# Altium PCB Single_ETU_b_rev1.PcbDoc (part 2 of 6)
Units mil, origin at the board's own origin, x right, y up, seen from the top; angles counter-clockwise.
Board outline 5341 x 2710 mil, 10 copper layers (Top Layer, GND1, Signal 1, GND2, VDDA, VDD, GND3, Signal 2, GND4, Bottom Layer), stack 59.76 mil thick; 283 components, 478 nets, 1863 pads, 875 vias.
Unrouted connection lines stored in the file: 3.
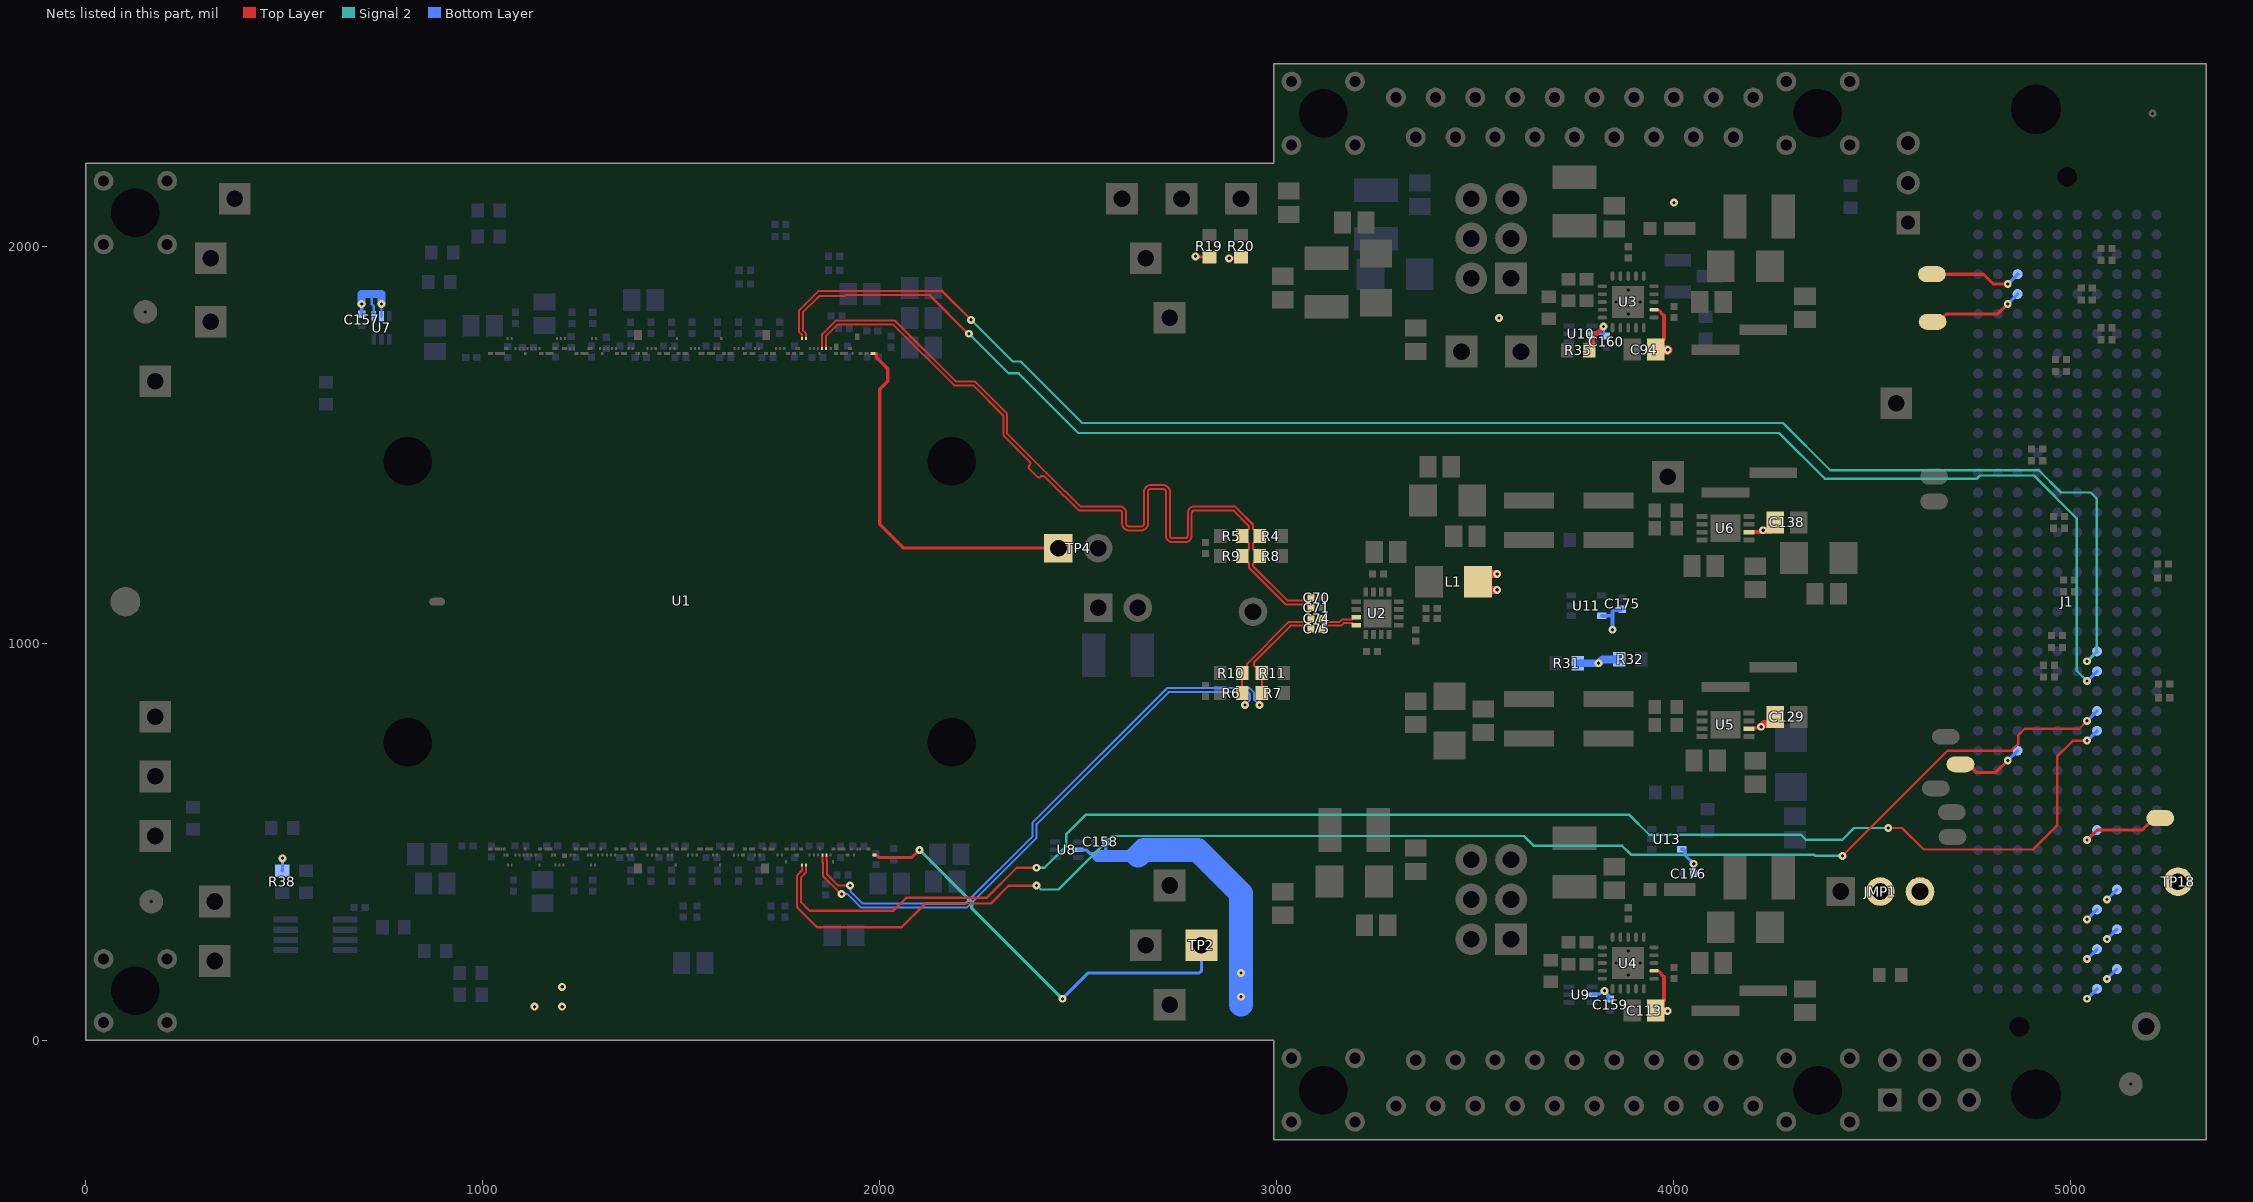
[diagram p10: the nets of this part, all layers, seen from the top]

## Part data
C1 C2 C3 C4 C5 C6 C7 C8 C9 C10 C11 C12 C13 C14 C15 C16 C17 C18 C19 C20 C21 C22 C23 C24 C25 C26 C27 C28 C29 C30 C31 C32 C33 C34 C35 C36 C37 C38 C39 C40 C41 C42 C43 C44 C45 C46 C47 C48 C49 C50 C51 C52 C53 C54 C55 C56 C57 C58 C59 C60 C61 C62 C63 C64 C65 C66 C68 C69 C70 C71 C72 C73 C74 C75 C76 C92 C96 C112 C115 C127 C135 C141 C142 C143 C144 C145 C146 C147 C148 C149 C150 C151 C152 C153 C154 C155 C156 C157 C158 C159 C160 C161 C162 C163 C164 C165 C166 C167 C168 C169 C170 C171 C172 C173 C174 C178: library part "cap 0.1uF", "CAP CER 0.1UF 10V 10% X5R 0201", Operating Temperature="-55°C ~ 85°C", Package / Case="0201 (0603 Metric)", Ratings=-, Temperature Coefficient=X5R, Tolerance=±10%, Voltage - Rated=6.3V, Applications="General Purpose", Capacitance=.1uF, Category=Capacitors, Features=-, Height - Seated (Max)=".013\" (0.33mm)", Lead Spacing=-, Lead Style=-, Mounting Type="Surface Mount, MLCC", Packaging="Cut Tape (CT)", RoHS="RoHS Compliant", Size / Dimension="0.024\" L x 0.012\" W (0.60mm x 0.30mm)", Supplier 1=Digi-Key, Thickness (Max)="0.013\" (0.33mm)"
  C153 C154 C169 C170: Assembly comment="DNP for VCU128 use"
C67 C78 C79 C83 C85 C86 C87 C97 C98 C102 C104 C105 C106 C116 C118 C119 C120 C121 C122 C126 C128 C130 C134 C136 C137 C139 C140: library part "cap 0.1uF", "CAP CER 22UF 10V 10% X5R 0805", Operating Temperature="-55°C ~ 85°C", Package / Case=0805, Ratings=-, Temperature Coefficient=X5R, Tolerance=±10%, Voltage - Rated=10V, Applications="General Purpose", Capacitance=22uF, Category=Capacitors, ComponentLink1Description=Samsung..., ComponentLink1URL=Samsung..., ComponentLink2URL=Samsung..., ComponentLink3URL=Samsung..., Features=-, Height - Seated (Max)=".055\" (1.40mm)", Lead Spacing=-, Lead Style=-, Mounting Type="Surface Mount, MLCC", Packaging="Cut Tape (CT)", RoHS="RoHS Compliant", Size / Dimension="0.079\" L x 0.024\" W (2.00mm x 1.25mm)", Supplier 1=Digi-Key, Thickness (Max)="0.055\" (1.4mm)"
C77 C81 C84 C90 C100 C103 C109 C117: library part "cap 0.1uF", "CAP CER 47UF 10V 10% X7R 1210", Manufacturer=Murata, Operating Temperature="-55°C ~ 125°C", Package / Case=1210, Ratings=-, Temperature Coefficient=X7R, Tolerance=±10%, Voltage - Rated=10V, Applications="General Purpose", Capacitance=47uF, Category=Capacitors, ComponentLink1Description=Murata, ComponentLink1URL=Murata, ComponentLink2URL=Murata, ComponentLink3URL=Murata, Features=-, Height - Seated (Max)=".106\" (2,7mm)", Lead Spacing=-, Lead Style=-, Mounting Type="Surface Mount, MLCC", Packaging="Cut Tape (CT)", RoHS="RoHS Compliant", Size / Dimension="0.126\" L x 0.098\" W (3.20mm x 2.50mm)", Supplier 1=Digi-Key, Thickness (Max)="0.106\" (2.7mm)"
C80 C82 C89 C93 C94 C99 C101 C108 C110 C113 C123 C124 C125 C129 C131 C132 C133 C138: library part "cap 0.1uF", "CAP CER 10UF 10V 10% X7R 0805", Operating Temperature="-55°C ~ 125°C", Package / Case=0805, Ratings=-, Temperature Coefficient=X7R, Tolerance=±10%, Voltage - Rated=10V, Applications="General Purpose", Capacitance=10uF, Category=Capacitors, ComponentLink1Description=Samsung..., ComponentLink1URL=Samsung..., ComponentLink2URL=Samsung..., ComponentLink3URL=Samsung..., Features=-, Height - Seated (Max)=".055\" (1.40mm)", Lead Spacing=-, Lead Style=-, Mounting Type="Surface Mount, MLCC", Packaging="Cut Tape (CT)", RoHS="RoHS Compliant", Size / Dimension="0.079\" L x 0.024\" W (2.00mm x 1.25mm)", Supplier 1=Digi-Key, Thickness (Max)="0.055\" (1.4mm)"
C88 C95 C107 C114 C175 C176: library part "cap 0.1uF", "CAP CER 0.1UF 10V 10% X5R 0201", Manufacturer="TDK Corporation", Operating Temperature="-55°C ~ 85°C", Package / Case="0201 (0603 Metric)", Ratings=-, Temperature Coefficient=X5R, Tolerance=±10%, Voltage - Rated=6.3V, Applications="General Purpose", Capacitance=.1uF, Category=Capacitors, ComponentLink1Description=http://www.tdk.com/pdf/TDKMLCCCapRange.pdf, ComponentLink1URL=http://www.tdk.com/pdf/mlcc_prod_guide/MLCC%20Product%20Guide%20A14.pdf, ComponentLink2URL=http://product.tdk.com/en/catalog/datasheets/mlcc_commercial_general_en.pdf, ComponentLink3URL=http://product.tdk.com/en/catalog/spec/mlccspec_commercial_general_midvoltage_en.pdf, Features=-, Height - Seated (Max)=".013\" (0.33mm)", Lead Spacing=-, Lead Style=-, Mounting Type="Surface Mount, MLCC", Packaging="Cut Tape (CT)", RoHS="RoHS Compliant", Size / Dimension="0.024\" L x 0.012\" W (0.60mm x 0.30mm)", Supplier 1=Digi-Key, Thickness (Max)="0.013\" (0.33mm)"
C91 C111: library part "cap 0.1uF", "CAP CER 0.01UF 10V 10% X5R 0603", Operating Temperature="-55°C ~ 85°C", Package / Case=1608[0603], Ratings=-, Temperature Coefficient=X5R, Tolerance=±10%, Voltage - Rated=10V, Applications="General Purpose", Capacitance=0.01uF, Category=Capacitors, ComponentLink1Description=http://www.tdk.com/pdf/TDKMLCCCapRange.pdf, ComponentLink2URL=http://product.tdk.com/en/catalog/datasheets/mlcc_commercial_general_en.pdf, ComponentLink3URL=http://product.tdk.com/en/catalog/spec/mlccspec_commercial_general_midvoltage_en.pdf, Features=-, Height - Seated (Max)=".037\" (0.95mm)", Lead Spacing=-, Lead Style=-, Mounting Type="Surface Mount, MLCC", Packaging="Cut Tape (CT)", RoHS="RoHS Compliant", Size / Dimension="0.063\" L x 0.031\" W (1.60mm x 0.80mm)", Supplier 1=Digi-Key, Thickness (Max)="0.037\" (0.95mm)"
C177: library part "cap 0.1uF", "CAP CER 100pF 10V 10% X5R 0603", Capacitance=0.01uF, Operating Temperature="-55°C ~ 85°C", Package / Case=1608[0603], Ratings=-, Temperature Coefficient=X5R, Tolerance=±10%, Voltage - Rated=10V, Applications="General Purpose", Category=Capacitors, ComponentLink1Description=http://www.tdk.com/pdf/TDKMLCCCapRange.pdf, ComponentLink2URL=http://product.tdk.com/en/catalog/datasheets/mlcc_commercial_general_en.pdf, ComponentLink3URL=http://product.tdk.com/en/catalog/spec/mlccspec_commercial_general_midvoltage_en.pdf, Features=-, Height - Seated (Max)=".037\" (0.95mm)", Lead Spacing=-, Lead Style=-, Mounting Type="Surface Mount, MLCC", Packaging="Cut Tape (CT)", RoHS="RoHS Compliant", Size / Dimension="0.063\" L x 0.031\" W (1.60mm x 0.80mm)", Supplier 1=Digi-Key, Thickness (Max)="0.037\" (0.95mm)"
D1 D2: library part "D Schottky", "1A @ 0.58V SMT Schottky diode, TJ -40 to +175degC, Vrrm 100V, Ir 200uA @ 70V @125degC, DO-219AD (MicroSMP)", package=DO-219ADC, ETU_manf=Vishay, ETU_PN=V1PM10-M3/H, ETU_PN_PO=V1PM10-M3/HGICT-ND, ETU_vendor=Digikey.com
J1: "MC-HPC-10, FMC High-pin count connector, lead free, 400 I/Os, male, 10 mm mated stack height", Manufacturer=Samtec, Manufacturer Ref=SEAM-40-03.5-S-10-2-A-K-TR-VITA57.0, PartName=ASP-134488-01, Supplier Part Number 1=SAM8730-ND, Gender=male, Mated Stack Height="10 mm", Number I/O=400, Part=ASP-134488-01, Pin Count=High, Pitch="1.27 mm", Solder Type=Lead-Free, Supplier 1=Digi-Key, Vita PartNumber=MC-HPC-10
J2: "Header, 3-Pin, Dual row", LatestRevisionDate=17-Jul-2002, LatestRevisionNote="Re-released for DXP Platform.", Publisher="Altium Limited"
J3 TP4: "Header, 2-Pin", LatestRevisionDate=17-Jul-2002, LatestRevisionNote="Re-released for DXP Platform.", Publisher="Altium Limited"
JMP1 JMP10: "Header, 3-Pin", LatestRevisionDate=17-Jul-2002, LatestRevisionNote="Re-released for DXP Platform.", Publisher="Altium Limited"
JMP2 JMP3 JMP6 JMP8: library part "Header 2", "Header, 2-Pin, 0.05\" pitch", LatestRevisionDate=17-Jul-2002, LatestRevisionNote="Re-released for DXP Platform.", Publisher="Altium Limited"
JMP4 JMP5: "Header, 3-Pin, Dual row, SMT", LatestRevisionDate=17-Jul-2002, LatestRevisionNote="Re-released for DXP Platform.", Publisher="Altium Limited"
JMP7 JMP9: library part "Header 2X2", "Header, 2-Pin, Dual row, SMT", LatestRevisionDate=17-Jul-2002, LatestRevisionNote="Re-released for DXP Platform.", Publisher="Altium Limited"
L1 L2 L3 L4 L5 L6 L7 L8 L9 L10: Current Rating="4 Amps", DC Resistance (DCR)="0.03 ohms (Max)", Inductance="120 ohms @ 100MHz", Manufacturer="Laird-Signal Integrity Products", Manufacturer Part Number=HI1206P121R-10, Package / Case="1206 (3216 Metric)", Supplier Part Number 1=240-2410-1-ND, Applications="power filter", Category=Inductors, ComnponentLink3Description=http://lairdtech.thomasnet.com/Asset/Part-Number-Nomenclature-FErrite-EMI.pdf, ComponentLink1Description=http://www.lairdtech.com/WorkArea/linkit.aspx?LinkIdentifier=id&ItemID=4849, ComponentLink1URL=http://lairdtech.thomasnet.com/item/differential-mode/chip-beads-power-filtering/pn-5776, ComponentLink2Description=http://www.lairdtech.com/WorkArea/linkit.aspx?LinkIdentifier=id&ItemID=1939, Height - Seated (Max)="0.051\" (1.30mm)", Mounting Type="Surface Mount", Packaging="Cut Tape (CT)", Pricing 1="1=0.1, 10=0.087, 25=0.0788, 50=0.0708, 100=0.05190, 250=0.03776, 500=0.0346, 1000=0.02989", RoHS="RoHS Compliant", Size / Dimension="0.126\" L x 0.062\" W (3.20mm x 1.60mm)", Supplier 1=Digi-Key, Thickness (Max)="0.051\" (1.30mm)"
R1 R2 R21 R22: library part R, "1k ohm 1/10W 50V 1% +/- 100 PPM thick film resistor. 0603.", package=RM0603, ETU_manf="Vishay Dale", ETU_manf_ds=http://www.vishay.com/docs/20035/dcrcwe3.pdf, ETU_manf_url=http://www.vishay.com/resistors-fixed/list/product-20035/, ETU_PN=CRCW06031K00FKEA, ETU_PN_PO=541-1.00KHCT-ND, ETU_vendor=Digikey, item=23b, manf="State of the Art", manf_ds=http://www.resistor.com/assets/pdf/12mil.pdf, manf_url=http://www.resistor.com/pthick_mil.htm, Min PO QTY=36, PN=M55342K12B1E00R, PN_PO=M55342K12B1E00R, Vendor="State of the Art"
  R1 R2: Assembly comment="DNP for bottom side control"
  R21 R22: Assembly comment="DNP for top side control"
R3 R12 R13 R14 R19 R20 R30 R31 R32 R33 R34 R36 R37: library part R, "4.7k ohm 1/10W 50V 1% +/- 25 PPM thin film resistor. 0603.", package=RM0603, manf="State of the Art", Vendor="State of the Art"
  R19 R36: ETU_manf_ds=http://www.vishay.com/docs/20035/dcrcwe3.pdf, ETU_manf_url=http://www.vishay.com/resistors-fixed/list/product-20035/, manf_ds=http://www.resistor.com/assets/pdf/12milthn.pdf, manf_url=http://www.resistor.com/pthin_mil.htm, PN_PO=55342E12B10E0R
  R20 R37: ETU_manf_ds=http://www.vishay.com/docs/20035/dcrcwe3.pdf, ETU_manf_url=http://www.vishay.com/resistors-fixed/list/product-20035/, manf_ds=http://www.resistor.com/assets/pdf/12milthn.pdf, manf_url=http://www.resistor.com/pthin_mil.htm
R4 R5 R6 R7 R35: library part R, "10k ohm 1/10W 50V 1% +/- 25 PPM thin film resistor. 0603.", package=RM0603, manf="State of the Art", Vendor="State of the Art"
  R4 R5 R6 R7: ETU_manf_ds=http://www.vishay.com/docs/20035/dcrcwe3.pdf, ETU_manf_url=http://www.vishay.com/resistors-fixed/list/product-20035/, ETU_PN_PO=541-10.0-KHCT-ND, manf_ds=http://www.resistor.com/assets/pdf/12milthn.pdf, manf_url=http://www.resistor.com/pthin_mil.htm, PN=M55342E12B10E0R, PN_PO=M55342E12B10E0R
R8 R9 R10 R11: library part R, "2k ohm 1/10W 50V 1% +/- 25 PPM thin film resistor. 0603.", package=RM0603, manf="State of the Art", manf_ds=http://www.resistor.com/assets/pdf/12milthn.pdf, manf_url=http://www.resistor.com/pthin_mil.htm, Vendor="State of the Art"
R15 R16 R17 R18: library part R, "0k ohm 0603.", package=RM0603, ETU_manf="Vishay Dale", ETU_vendor=Digikey, manf="State of the Art", Vendor="State of the Art"
  R15 R16: Assembly comment="DNP for bottom side control"
  R17 R18: Assembly comment="DNP for top side control"
R23 R25: library part R, "12.4k ohm 1/10W 50V 1% +/- 25 PPM thin film resistor. 0603.", package=RM0603, manf="State of the Art", Vendor="State of the Art"
R24 R26: library part R, "24.9k ohm 1/10W 50V 1% +/- 25 PPM thin film resistor. 0603.", package=RM0603, manf="State of the Art", Vendor="State of the Art"
R27 R28: library part R, "8.2k ohm 1/10W 50V 1% +/- 25 PPM thin film resistor. 0603.", package=RM0603, manf="State of the Art", Vendor="State of the Art"
R29: library part R, "0 ohm jumper. 1/2W. 20Amp. 0603.", package=RM0603, Assembly comment="Do not populate", manf="State of the Art", Vendor="State of the Art"
R38: library part R, "200k ohm 0603.", package=RM0603, Assembly comment="DNP for bottom side control", ETU_manf="Vishay Dale", ETU_vendor=Digikey, manf="State of the Art", Vendor="State of the Art"
R39: library part R, "160k ohm 0603.", package=RM0603, Assembly comment="DNP for bottom side control", ETU_manf="Vishay Dale", ETU_vendor=Digikey, manf="State of the Art", Vendor="State of the Art"
TP1: library part TP, "test point, wire bonding site"
TP2 TP3 TP5 TP6 TP7 TP8 TP9 TP10 TP12 TP13 TP15 TP16 TP18 TP19 TP20 TP21 TP22 TP23 TP26 TP27 TP28 TP29 TP30 TP31: "test point, wire bonding site"
U1: "Wire bonding scenario - Top and Bottom peripheries of of the chip - Updated the 27th June 2020"
U2: library part NB6L11SMNG, "No Description Available", Copyright="Copyright (C) 2016 Accelerated Designs. All rights reserved", Manufacturer_Part_Number=NB6L11SMNG, RefDes=RefDes, SourceLibrary=ONSemi_2017-12-12_4, Type=DEV, Vendor="ON Semiconductor"
U3 U4: "No Description Available", Manufacturer="Texas Instruments", Copyright="Copyright (C) 2018 Accelerated Designs. All rights reserved", PartNumber=TPS7A8500RGRR, RefDes=RefDes, Type=DEV
U5 U6: library part ST1L08PUR, "No Description Available", Built_By=EMA_Cory, Copyright="Copyright (C) 2018 Accelerated Designs. All rights reserved", Datasheet=https://www.st.com/content/ccc/resource/technical/document/datasheet/5f/25/d1/3f/f8/25/44/07/DM00123507.pdf/files/DM00123507.pdf/jcr:content/translations/en.DM00123507.pdf, Manufacturer_Part_Number=ST1L08PUR, RefDes=RefDes, SourceLibrary=Add_to_database_2020-12-03, Type=DEV, Vendor=STMicroelectronics
U7 U8 U9 U10: "Low Power Digital Temperature Sensor with SMBus/Two-Wire Serial Interface in SOT563", Manufacturer="Texas Instruments", PACKAGE_DESIGNATOR=DRL, Copyright="Copyright (C) 2018 Accelerated Designs. All rights reserved", Datasheet_URL=http://www.ti.com/lit/gpn/TMP102, FAMILY_NAME="TEMPERATURE SENSOR", GENERIC_PART_NUMBER=TMP102, INDUSTRY_STD_PKG_TYPE=SOT, Manufacturer_Part_Number=TMP102AIDRLR, PIN_COUNT=6, RefDes=RefDes, Type=DEV, Vendor="Texas Instruments"
U11 U12 U13: "No Description Available", Built_By=EMA_Jessica, Copyright="Copyright (C) 2018 Accelerated Designs. All rights reserved", RefDes=RefDes, SourceLibrary=ON_Semiconductor_2019-12-30, Type=DEV, Vendor="ON Semiconductor"
  U11 U13: Manufacturer_Part_Number=NC7SZ08P5X
  U12: Manufacturer_Part_Number=BSS123
U14: "Dual Bi-Directional I2C-Bus and SMBus Voltage Level-Translator", Manufacturer="Texas Instruments", PACKAGE_DESIGNATOR=DCT, Copyright="Copyright (C) 2018 Accelerated Designs. All rights reserved", Datasheet_URL=http://www.ti.com/lit/gpn/PCA9306, FAMILY_NAME="I2C SPECIAL FUNCTION", GENERIC_PART_NUMBER=PCA9306, INDUSTRY_STD_PKG_TYPE=SM8, Manufacturer_Part_Number=PCA9306DCTRE4, PIN_COUNT=8, RefDes=RefDes, Type=DEV, Vendor="Texas Instruments"

## Free pads (board coordinates)
  round 2 / inner round 200 / far side round 2 hole 122 unplated: 0(811,751) 0(811,1459) 0(2181,751) 0(2181,1459)
  round 50 hole 28: 1(45,45) 1(45,205) 1(45,2005) 1(45,2165) 1(205,45) 1(205,205) 1(205,2005) 1(205,2165) 1(3037,-205) 1(3037,-45) 1(3037,2255) 1(3037,2415) 1(3197,-205) 1(3197,-45) 1(3197,2255) 1(3197,2415) 1(3300,-165) 1(3300,2375) 1(3350,-50) 1(3350,2275) 1(3400,-165) 1(3400,2375) 1(3449.84,-49.68) 1(3450,2275) 1(3499.84,-164.68) 1(3499.84,2375.32) 1(3549.84,-49.68) 1(3549.84,2275.32) 1(3599.84,-164.68) 1(3599.84,2375.32) 1(3649.84,-49.68) 1(3649.84,2275.32) 1(3699.84,-164.68) 1(3699.84,2375.32) 1(3749.84,2275.32) 1(3750,-50) 1(3800,-165) 1(3800,2375) 1(3849.84,-49.68) 1(3850,2275) 1(3899.84,-164.68) 1(3899.84,2375.32) 1(3949.84,-49.68) 1(3949.84,2275.32) 1(3999.84,-164.68) 1(3999.84,2375.32) 1(4049.84,2275.32) 1(4050,-50) 1(4100,-165) 1(4100,2375) 1(4150,-50) 1(4150,2275) 1(4200,-165) 1(4200,2375) 1(4283,-205) 1(4283,-45) 1(4283,2255) 1(4283,2415) 1(4443,-205) 1(4443,-45) 1(4443,2255) 1(4443,2415)
  round 2 hole 122 unplated: 1(125,125) 1(125,2085) 1(3117,-125) 1(3117,2335) 1(4363,-125) 1(4363,2335)
  round 2 hole 125 unplated: 2(4912.26,-135.15) 2(4912.26,2345.15)
  rect 30x16 on Mech8 paste-13: 3(1010,484)
  rect 23x20 on Mech8 paste-13: 3(1052.85,461) 3(1265,461)
  rect 24x20 on Mech8 paste-13: 3(1173,461)
  rect 20x26 smd paste-10: 3(1391,433) 3(1391,1777) 3(1711,433) 3(1714,1777)
  round 72 hole 42: 4(2940,1080)
  rect 5x10 on Mech8: 6(1062.5,1769) 7(1073,1769)
  rect 5x8 on Mech8: 6(1063,442) 7(1073,442) 14(1143,442) 35(1580,467) 36(1590.5,467) 37(1643.5,467) 38(1633,467) 39(1686,467) 39(1696.5,467) 41(1742.5,467) 42(1754,467) 48(1876,467) 52(1882,450) 53(1704,442) 53(1707,482) 53(1712,482) 53(1788,467) 53(1794,467) 58(1384,442) 59(1597.5,442)
  rect 5x16 on Mech8: 8(1083,463) 8(1083,1747) 9(1093,463) 9(1093,1747) 10(1103,463) 10(1103,1747) 11(1113,463) 11(1113,1747) 12(1133,463) 12(1133,1747) 13(1123,463) 13(1123,1747) 14(1143,1747) 15(1183,438) 15(1187,1772) 16(1193,438) 16(1197,1772) 17(1203,438) 17(1207,1772) 18(1220,1747) 18(1220.5,463) 19(1230,1747) 19(1231,463) 20(1273,438) 20(1275,1772) 21(1283,438) 21(1285,1772) 22(1290,463) 22(1295,1747) 23(1335,1747) 24(1325,1747) 25(1312.5,463) 25(1315,1747) 26(1302,463) 26(1305,1747) 27(1365,463) 28(1375.5,463) 29(1414.5,1747) 29(1415.5,463) 30(1425,1747) 30(1426,463) 31(1477,463) 32(1466.5,463) 33(1517.5,463) 33(1524,1747) 34(1528,463) 34(1534.5,1747) 37(1644.5,1747) 38(1634,1747) 39(1696,1747) 40(1685.5,1747) 41(1738,1747) 42(1748.5,1747) 43(1814,438) 44(1804,438) 45(1844,1747) 45(1844.5,463) 46(1834,463) 46(1834,1747) 47(1823.5,463) 47(1824,1747) 48(1865,1747) 48(1866,463) 49(1854.5,1747) 49(1855.5,463) 53(1763.5,450) 57(1437,463)
  rect 6x8 on Mech8: 10(1107,482) 11(1107,1730) 26(1297,482) 50(1935,467) 55(1654,467) 58(1301,1730) 58(1384,1768) 60(1486,442)
  rect 12x8 on Mech8: 17(1206,1743) 51(1983,1730)
  rect 12x12 on Mech8: 18(1206,465)
  rect 5x9 on Mech8: 23(1333.5,466.5)
  rect 5x12 on Mech8: 24(1323,465) 27(1366.5,1745) 28(1377,1745) 31(1482.5,1745) 32(1472,1745)
  rect 5x14 on Mech8: 35(1583.5,1746) 36(1594,1746) 43(1814,1771) 44(1804,1771)
  rect 12x16 on Mech8: 50(1943,1772) 52(1890.5,1747)
  rect 10x8 on Mech8: 51(1987,467)
  rect 6x16 on Mech8: 52(1876,1747) 56(1539,463)
  round 10 on Mech8: 61(885,1105)
  oval 40x20 on Mech8 mask+15: 62(885,1105)
  oval 70x40 smd: 64(4650,1930) 64(4651.73,1810) 64(4655.49,1357.59) 64(4655.49,1420) 64(4660,635) 64(4685,765) 64(4700,575) 64(4702,512.59) 64(4722,695.45) 64(5225,560)
  round 60 hole 8 mask+60: Fiducial1(165,350) Fiducial2(150,1835)
  round 60 / inner round 60 / far side round 20 hole 8 mask+60: Fiducial3(5151,-110)
  round 20 / inner round 60 / far side round 60 hole 8 mask+5: Fiducial4(5206,2335)
  rect 2.76x3.94 on Mech2: L1(1021.8,518.07) L2(1028.29,518.07) L3(1034.79,518.07) L4(1041.28,518.07) L5(1047.78,518.07) L6(1054.28,518.07) L7(1060.77,518.07) L8(1067.27,518.07) L9(1073.76,518.07) L10(1080.26,518.07) L11(1086.76,518.07) L12(1093.25,518.07) L13(1099.75,518.07) L14(1106.24,518.07) L15(1112.74,518.07) L16(1119.24,518.07) L17(1125.73,518.07) L18(1132.23,518.07) L19(1138.72,518.07) L20(1145.22,518.07) L21(1151.72,518.07) L22(1158.21,518.07) L23(1164.71,518.07) L24(1171.2,518.07) L25(1177.7,518.07) L26(1184.2,518.07) L27(1190.69,518.07) L28(1197.19,518.07) L29(1203.69,518.07) L30(1210.18,518.07) L31(1216.68,518.07) L32(1223.17,518.07) L33(1229.67,518.07) L34(1236.17,518.07) L35(1242.66,518.07) L36(1249.16,518.07) L37(1255.65,518.07) L38(1262.15,518.07) L39(1268.65,518.07) L40(1275.14,518.07) L41(1281.64,518.07) L42(1288.13,518.07) L43(1294.63,518.07) L44(1301.13,518.07) L45(1307.62,518.07) L46(1314.12,518.07) L47(1320.61,518.07) L48(1327.11,518.07) L49(1333.61,518.07) L50(1340.1,518.07) L51(1346.6,518.07) L52(1353.09,518.07) L53(1359.59,518.07) L54(1366.09,518.07) L55(1372.58,518.07) L56(1379.08,518.07) L57(1385.57,518.07) L58(1392.07,518.07) L59(1398.57,518.07) L60(1405.06,518.07) L61(1411.56,518.07) L62(1418.06,518.07) L63(1424.55,518.07) L64(1431.05,518.07) L65(1437.54,518.07) L66(1444.04,518.07) L67(1450.54,518.07) L68(1457.03,518.07) L69(1463.53,518.07) L70(1470.02,518.07) L71(1476.52,518.07) L72(1483.02,518.07) L73(1489.51,518.07) L74(1496.01,518.07) L75(1502.5,518.07) L76(1509,518.07) L77(1515.5,518.07) L78(1521.99,518.07) L79(1528.49,518.07) L80(1534.98,518.07) L81(1541.48,518.07) L82(1547.98,518.07) L83(1554.47,518.07) L84(1560.97,518.07) L85(1567.46,518.07) L86(1573.96,518.07) L87(1580.46,518.07) L88(1586.95,518.07) L89(1593.45,518.07) L90(1599.94,518.07) L91(1606.44,518.07) L92(1612.94,518.07) L93(1619.43,518.07) L94(1625.93,518.07) L95(1632.43,518.07) L96(1638.92,518.07) L97(1645.42,518.07) L98(1651.91,518.07) L99(1658.41,518.07) L100(1664.91,518.07) L101(1671.4,518.07) L102(1677.9,518.07) L103(1684.39,518.07) L104(1690.89,518.07) L105(1697.39,518.07) L106(1703.88,518.07) L107(1710.38,518.07) L108(1716.87,518.07) L109(1723.37,518.07) L110(1729.87,518.07) L111(1736.36,518.07) L112(1742.86,518.07) L113(1749.35,518.07) L114(1755.85,518.07) L115(1762.35,518.07) L116(1768.84,518.07) L117(1775.34,518.07) L118(1781.83,518.07) L119(1788.33,518.07) L120(1794.83,518.07) L121(1801.32,518.07) L122(1807.82,518.07) L123(1814.32,518.07) L124(1820.81,518.07) L125(1827.31,518.07) L126(1833.8,518.07) L127(1840.3,518.07) L128(1846.8,518.07) L129(1853.29,518.07) L130(1859.79,518.07) L131(1866.28,518.07) L132(1872.78,518.07) L133(1879.28,518.07) L134(1885.77,518.07) L135(1892.27,518.07) L136(1898.76,518.07) L137(1905.26,518.07) L138(1911.76,518.07) L139(1918.25,518.07) L140(1924.75,518.07) L141(1931.24,518.07) L142(1937.74,518.07) L143(1944.24,518.07) L144(1950.73,518.07) L145(1957.23,518.07) L146(1963.72,518.07) L147(1970.2,518.07) L147(1970.99,1967) L148(1021.79,1691.93) L149(1028.28,1691.93) L150(1034.78,1691.93) L151(1041.27,1691.93) L152(1047.77,1691.93) L153(1054.27,1691.93) L154(1060.76,1691.93) L155(1067.26,1691.93) L156(1073.75,1691.93) L157(1080.25,1691.93) L158(1086.75,1691.93) L159(1093.24,1691.93) L160(1099.74,1691.93) L161(1106.23,1691.93) L162(1112.73,1691.93) L163(1119.23,1691.93) L164(1125.72,1691.93) L165(1132.22,1691.93) L166(1138.72,1691.93) L167(1145.21,1691.93) L168(1151.71,1691.93) L169(1158.2,1691.93) L170(1164.7,1691.93) L171(1171.2,1691.93) L172(1177.69,1691.93) L173(1184.19,1691.93) L174(1190.68,1691.93) L175(1197.18,1691.93) L176(1203.68,1691.93) L177(1210.17,1691.93) L178(1216.67,1691.93) L179(1223.16,1691.93) L180(1229.66,1691.93) L181(1236.16,1691.93) L182(1242.65,1691.93) L183(1249.15,1691.93) L184(1255.64,1691.93) L185(1262.14,1691.93) L186(1268.64,1691.93) L187(1275.13,1691.93) L188(1281.63,1691.93) L189(1288.12,1691.93) L190(1294.62,1691.93) L191(1301.12,1691.93) L192(1307.61,1691.93) L193(1314.11,1691.93) L194(1320.61,1691.93) L195(1327.1,1691.93) L196(1333.6,1691.93) L197(1340.09,1691.93) L198(1346.59,1691.93) L199(1353.09,1691.93) L200(1359.58,1691.93) L201(1366.08,1691.93) L202(1372.57,1691.93) L203(1379.07,1691.93) L204(1385.57,1691.93) L205(1392.06,1691.93) L206(1398.56,1691.93) L207(1405.05,1691.93) L208(1411.55,1691.93) L209(1418.05,1691.93) L210(1424.54,1691.93) L211(1431.04,1691.93) L212(1437.53,1691.93) L213(1444.03,1691.93) L214(1450.53,1691.93) L215(1457.02,1691.93) L216(1463.52,1691.93) L217(1470.01,1691.93) L218(1476.51,1691.93) L219(1483.01,1691.93) L220(1489.5,1691.93) L221(1496,1691.93) L222(1502.49,1691.93) L223(1508.99,1691.93) L224(1515.49,1691.93) L225(1521.98,1691.93) L226(1528.48,1691.93) L227(1534.98,1691.93) L228(1541.47,1691.93) L229(1547.97,1691.93) L230(1554.46,1691.93) L231(1560.96,1691.93) L232(1567.46,1691.93) L233(1573.95,1691.93) L234(1580.45,1691.93) L235(1586.94,1691.93) L236(1593.44,1691.93) L237(1599.94,1691.93) L238(1606.43,1691.93) L239(1612.93,1691.93) L240(1619.42,1691.93) L241(1625.92,1691.93) L242(1632.42,1691.93) L243(1638.91,1691.93) L244(1645.41,1691.93) L245(1651.9,1691.93) L246(1658.4,1691.93) L247(1664.9,1691.93) L248(1671.39,1691.93) L249(1677.89,1691.93) L250(1684.38,1691.93) L251(1690.88,1691.93) L252(1697.38,1691.93) L253(1703.87,1691.93) L254(1710.37,1691.93) L255(1716.86,1691.93) L256(1723.36,1691.93) L257(1729.86,1691.93) L258(1736.35,1691.93) L259(1742.85,1691.93) L260(1749.35,1691.93) L261(1755.84,1691.93) L262(1762.34,1691.93) L263(1768.83,1691.93) L264(1775.33,1691.93) L265(1781.83,1691.93) L266(1788.32,1691.93) L267(1794.82,1691.93) L268(1801.31,1691.93) L269(1807.81,1691.93) L270(1814.31,1691.93) L271(1820.8,1691.93) L272(1827.3,1691.93) L273(1833.79,1691.93) L274(1840.29,1691.93) L275(1846.79,1691.93) L276(1853.28,1691.93) L277(1859.78,1691.93) L278(1866.27,1691.93) L279(1872.77,1691.93) L280(1879.27,1691.93) L281(1885.76,1691.93) L282(1892.26,1691.93) L283(1898.75,1691.93) L284(1905.25,1691.93) L285(1911.75,1691.93) L286(1918.24,1691.93) L287(1924.74,1691.93) L288(1931.23,1691.93) L289(1937.73,1691.93) L290(1944.23,1691.93) L291(1950.72,1691.93) L292(1957.22,1691.93) L293(1963.72,1691.93) L294(1970.21,1691.93)

## Via types
v1: diameter 20, hole 8, Top Layer to Bottom Layer, tented bottom, 402 vias
v2: diameter 20, hole 8, Top Layer to Bottom Layer, 199 vias
v3: diameter 30, hole 16, Top Layer to Bottom Layer, 160 vias
v4: diameter 20, hole 8, Top Layer to Bottom Layer, tented top, 89 vias
v5: diameter 18, hole 8, Top Layer to Bottom Layer, 6 vias
v6: diameter 18/25/25/25/25/18 (per signal layer), hole 8, Top Layer to Bottom Layer, tented bottom, 4 vias
v7: diameter 18/20/20/20/20/18 (per signal layer), hole 8, Top Layer to Bottom Layer, tented bottom, 4 vias
v8: diameter 80, hole 42, Top Layer to Bottom Layer, 2 vias
v9: diameter 18/25/25/25/25/18 (per signal layer), hole 8, Top Layer to Bottom Layer, 2 vias
v10: diameter 20/20/20/20/20/18 (per signal layer), hole 8, Top Layer to Bottom Layer, tented bottom, 2 vias
v11: diameter 40/20/20/20/20/40 (per signal layer), hole 8, Top Layer to Bottom Layer, 2 vias
v12: diameter 20/20/20/20/20/18 (per signal layer), hole 8, Top Layer to Bottom Layer, 1 vias
v13: diameter 40/20/20/20/20/40 (per signal layer), hole 8, Top Layer to Bottom Layer, tented top, 1 vias
v14: diameter 20, hole 8, Top Layer to Bottom Layer, tented both sides, 1 vias

## Nets (pads, with @x,y where several pads share a name; then routed paths per layer and width w, separated by ;. In a path a pad name is that pad's centre, name@x,y a point inside that pad or via, vN(x,y) a via of type N, cw(c..) or ccw(c..) an arc to the next point about the centre after c; other vN are vias at no path point)
3P3V: C94.1 C113.1 C129.1 C138.1 C157.1 C158.1 C159.1 C160.1 C175.1 C176.1 JMP1.2 L1.1 R19.1 R20.1 R31.2 R32.1 R35.2 R38.1 U3.12 U4.12 U5.2 U6.2 U7.4 U7.5 U8.5 U9.5 U10.5 U11.5 U13.5 | length 2044.5
  Top Layer w8: v4@2793.52,1973.52 v4(2795,1975) ; v4@2796.07,1973.52 R19.1@2828.52,1973.52 ; v4(2880,1970) 2907.56,1970 R20.1@2910,1972.44 ; U4.12@3949.96,175.32 3950.24,175.04 3960.28,175.04 3975,160.31 ; U3.12@3949.96,1840.32 3950.24,1840.04 3960.28,1840.04 3975,1825.31 ; U5.2@4189,785.16 4191,787.16 4213.91,787.16 4216.75,790 v4(4220,790)
  Top Layer w10: C113.1@3960,85 3975,100 3975,160.31 ; C94.1@3960,1750 3975,1765 3975,1825.31 ; U6.2@4189,1280.16 v4@4217.45,1280.16
  Top Layer w12: R35.2@3787.07,1737.96 3796,1746.89 3796,1771 v4(3823,1798)
  Top Layer w20: L1.1@3531.68,1135 v4(3555,1135) ; L1.1@3531.68,1175 v4(3555,1175) ; C113.1@3954.53,75 3955.06,74.47 v4(3984.48,74.47) ; C94.1@3954.53,1740 C94.1@3955.06,1739.47 ; v4(4220,790) 4227.44,797.44 4243.82,797.44 4255.47,809.09 C129.1@4255.47,810 ; v4(4225,1285) 4243.82,1285 4255.47,1296.65 C138.1@4255.47,1300
  Top Layer w25: C94.1@3955.06,1739.47 v4(3984.48,1739.47)
  Bottom Layer w6: 720,1876.64 720,1855 725.31,1849.69 U7.4@725.31,1824 ; U7.5@745,1824 v1(745,1855) ; U10.5@3794,1780 3824,1780 v4@3824,1797
  Bottom Layer w8: R38.1@495,427.56 495.76,428.32 v1(495.76,458.64) ; C157.1@695,1829 v1(695,1855) ; 716.64,1880 720,1876.64 ; U8.5@2500,480.31 2500.39,479.92 2520.08,479.92 2530,470 2544.38,470 2549.06,465.31 2549.06,465 ; C158.1@2569,500 2569,466 2570,465 ; U9.5@3794,115 3796,117 3813.75,117 3821.75,125 v1(3825,125) 3825,124.31 3835,114.31 3835,109 C159.1@3840,104 ; U11.5@3818,1069.5 3842.83,1069.5 3845.33,1067 ; v4(3823,1798) v4@3824,1797 ; 3845.33,1079.67 3849,1083.34 3867.34,1083.34 C175.1@3870,1086 ; U13.5@4019.84,481.7 4023.84,481.7 4027.84,477.7 4027.84,467.16 v1(4050,445) C176.1@4050,420
  Bottom Layer w10: v4(3845.33,1034.46) 3845.33,1067 3845.33,1079.67
  Bottom Layer w20: v1(695,1855) 695,1880 716.64,1880 ; 719.64,1880 742,1880 ; v1@745,1858 745,1877 ; R31.2@3757.56,950 v2(3810,950) 3820,960 R32.1@3862.44,960 ; 742,1880 745,1880 745,1877 ; 742,1880 745,1877
  Bottom Layer w30: 2549.06,465 2570,465 2650,465
  Bottom Layer w60: 2650,465 2665,480 2800,480 2910,370 v2(2910,170) v2(2910,110) 2910,90
  other v2: 1130,85 1200,85 1200,135 3560,1820 4000,2110
12P0V: J1.C35 J1.C37 TP18.1 | length 70.7
  Bottom Layer w8: v1(5091,255) J1.C37@5116,280 ; v1(5091,355) J1.C35@5116,380
B_N: C75.1 U2.4 | length 93.7
  Top Layer w5: C75.1@3114,1037 3120.5,1043.5 3122.43,1043.5 3123.43,1044.5 3162.11,1044.5 3168.39,1050.79 3189.65,1050.79 3194.49,1045.95 U2.4@3200,1045.95
B_P: C74.1 U2.3 | length 93.7
  Top Layer w5: C74.1@3114,1062 3120.5,1055.5 3122.43,1055.5 3123.43,1054.5 3157.96,1054.5 3164.25,1060.79 3189.65,1060.79 3194.49,1065.63 U2.3@3200,1065.63
CLK_DELAY_CLK: J1.H28 pad.64@4722,695.45 | length 175.3
  Top Layer w8: pad.64@4722,695.45 4741.36,695.45 4761.81,675 4811,675 v1(4841,705)
  Bottom Layer w8: v1(4841,705) J1.H28@4866,730
CLK_DELAY_DATA: J1.H4 pad.64@4650,1930 | length 236.7
  Top Layer w8: pad.64@4650,1930 4780,1930 4805,1905 v1(4841,1905)
  Bottom Layer w8: v1(4841,1905) J1.H4@4866,1930
CLK_DELAY_LOAD: J1.H5 pad.64@4651.73,1810 | length 243.3
  Top Layer w8: pad.64@4651.73,1810 4666.73,1810 4686.73,1830 4816,1830 v1(4841,1855)
  Bottom Layer w8: v1(4841,1855) J1.H5@4866,1880
CLK_REF_B_N: C75.2 R7.1 R11.2 U1.130 | length 1755.7
  Top Layer w5: v4(2956,845) 2956,868.56 R7.1@2962.44,875 2962.44,926.97 2949.19,940.22 2945.43,940.22 2942.5,943.15 2942.5,952.36 3034.64,1044.5 3076.57,1044.5 3077.57,1043.5 3079.5,1043.5 C75.2@3086,1037
  Top Layer w5.04: U1.130@1866,467 1866,453.01 1867.01,452 1867.01,418.06 1895.05,390 v1(1925.43,390)
  Bottom Layer w5.04: v1@1922.43,393 v1@1922.75,392.68 ; v1@1925.75,389.68 1925.75,375.57 1956.31,345 2215.81,345 2384.96,514.16 2384.96,549.16 2723.36,887.56 2931.67,887.56 2943.02,876.21 2943.02,857.98 v4(2956,845)
CLK_REF_B_P: C74.2 R6.1 R10.2 U1.129 | length 1758.2
  Top Layer w5: v1@1898.86,372 1901,372 v1@1902,372 ; v4(2920,845) 2920,867.56 R6.1@2912.56,875 R10.2@2912.56,925 2925,937.44 2925,949 3030.5,1054.5 3076.57,1054.5 3077.57,1055.5 3079.5,1055.5 C74.2@3086,1062
  Top Layer w5.04: U1.129@1855.5,467 1855.5,449.29 1856.95,447.84 1856.95,422.23 ; 1856.94,422.22 1856.94,413.89 v1@1898.83,372
  Bottom Layer w5.04: v1@1905,369 1918.12,369 1952.15,334.96 2219.96,334.96 2395,510 2395,545 2727.52,877.52 2927.51,877.52 2932.98,872.05 2932.98,857.98 v4(2920,845)
  other v1: 1904,369
CLK_REF_T_N: C71.2 R5.1 R9.2 U1.277 | length 2025.7
  Top Layer w5.04: U1.277@1865,1743 1864.77,1743.23 1864.77,1774.54 1893.13,1802.9 2034.1,1802.9 2187,1650 2235,1650 2310.96,1574.04 2310.96,1523.84 2347.4,1487.4 2377.49,1457.31 cw(c2373.25,1453.06) 2377.49,1448.82 2376.76,1448.08 ccw(c2381.01,1443.84) 2376.76,1439.59 2396.58,1419.77 ccw(c2400.82,1424.02) 2405.07,1419.77 2405.8,1420.51 cw(c2410.05,1416.26) 2414.3,1420.51 2451.46,1383.34 2461.15,1373.65 2462.59,1373.65 2466.75,1369.49 2472.21,1364.03 2495.99,1340.25 2501.24,1335 2603.69,1335 cw(c2603.69,1328.24) 2610.45,1328.24 2610.45,1301.57 ccw(c2627.24,1301.57) 2627.24,1284.78 2658.77,1284.78 ccw(c2658.77,1301.57) 2675.56,1301.57 2675.56,1381.98 cw(c2682.31,1381.98) 2682.31,1388.73 2713.84,1388.73 cw(c2713.84,1381.98) 2720.6,1381.98 2720.6,1271.79 ccw(c2737.39,1271.79) 2737.39,1255 2768.91,1255 ccw(c2768.91,1271.79) 2785.71,1271.79 2785.71,1328.24 cw(c2792.46,1328.24) 2792.46,1335 2800,1335 2890.25,1335 2929.98,1295.27 2929.98,1288.15 2927.03,1285.2 2925.79,1285.2 2912.56,1271.97 R5.1@2912.56,1270 2912.56,1268.03 2925.79,1254.8 2927.03,1254.8 2929.98,1251.85 2929.98,1238.15 2927.03,1235.2 2925.79,1235.2 2912.56,1221.97 R9.2@2912.56,1220 2912.56,1218.03 2925.79,1204.8 2927.03,1204.8 2929.98,1201.85 2929.98,1190.57 3023.07,1097.48 3076.57,1097.48 3077.57,1096.48 3079.52,1096.48 C71.2@3086,1090
CLK_REF_T_P: C70.2 R4.1 R8.2 U1.276 | length 2026.5
  Top Layer w5.04: U1.276@1854.5,1743 1854.5,1744.5 1854.73,1744.73 1854.73,1778.7 1888.97,1812.94 2032.91,1812.94 2038.26,1812.94 2191.16,1660.04 2239.16,1660.04 2321,1578.19 2321,1528 2465.31,1383.69 2466.75,1383.69 2470.91,1379.53 2479.3,1371.13 2504.77,1345.67 2505.4,1345.04 2603.69,1345.04 cw(c2603.69,1328.24) 2620.48,1328.24 2620.48,1301.57 ccw(c2627.24,1301.57) 2627.24,1294.82 2658.77,1294.82 ccw(c2658.77,1301.57) 2665.52,1301.57 2665.52,1381.98 cw(c2682.31,1381.98) 2682.31,1398.77 2713.84,1398.77 cw(c2713.84,1381.98) 2730.63,1381.98 2730.63,1271.79 ccw(c2737.39,1271.79) 2737.39,1265.04 2768.91,1265.04 ccw(c2768.91,1271.79) 2775.67,1271.79 2775.67,1328.24 cw(c2792.46,1328.24) 2792.46,1345.04 2800,1345.04 2894.41,1345.04 2902.38,1337.06 2940.02,1299.43 2940.02,1288.15 2942.97,1285.2 2944.21,1285.2 2957.44,1271.97 R4.1@2957.44,1270 2957.44,1268.03 2944.21,1254.8 2942.97,1254.8 2940.02,1251.85 2940.02,1238.15 2942.97,1235.2 2944.21,1235.2 2957.44,1221.97 R8.2@2957.44,1220 2957.44,1218.03 2944.21,1204.8 2942.97,1204.8 2940.02,1201.85 2940.02,1194.73 3027.23,1107.52 3076.57,1107.52 3077.57,1108.52 3079.52,1108.52 C70.2@3086,1115
DAC_OUT_B: TP2.1 U1.147 | length 1090.7
  Top Layer w8: U1.147@1988,467 1991.13,467 1997.13,461 2081,461 v1(2100,480)
  Signal 2 w8: v1(2100,480) 2231.71,348.29 2231.71,333.29 v2(2460,105)
  Bottom Layer w8: v2(2460,105) 2525,170 2805.31,170 2810,174.69 TP2.1@2810,240
DAC_OUT_T: TP4.1 U1.294 | length 936.1
  Top Layer w5: U1.294@1980,1730 U1.294@1983,1730 1991,1730
  Top Layer w8: 1991,1730 1991,1721 2020,1692 2020,1660 2000,1640 2000,1300 2060,1240 TP4.1@2450,1240
DIGITALPIXEL0_B: J1.D26 U1.123 | length 3694.5
  Top Layer w5.04: 1791.93,335 1791.93,415.93 1804,428 U1.123@1804,442
  Top Layer w6: 1791.93,335 1841.93,285 2055,285 2115,345 2280,345 2325,390 v2(2395,390) ; v2(4425,465) 4690,730 4850,730 4867,747 4867,768 4884,785 5021,785 v1(5041,805)
  Signal 2 w6: v2(2395,390) 2395.51,390 2405.51,380 2449.96,380 2584.96,515 3622.45,515 3647.45,490 3870,490 3892,468 4353,468 4356,465 v2(4425,465)
  Bottom Layer w8: v1(5041,805) J1.D26@5066,830
DIGITALPIXEL0_T: J1.D23 U1.270 | length 4036.4
  Top Layer w5: U1.270@1804,1768 1804,1777 1796,1785 1796,1838 1846,1888 2157,1888
  Top Layer w5.04: U1.270@1804,1768 U1.270@1803.98,1769.48
  Top Layer w6: 2157,1888 v2(2230,1815)
  Signal 2 w6: v2(2230,1815) 2335,1710 2355,1710 2510,1555 4275,1555 4394,1436 4919,1436 4975,1380 5050,1380 5065,1365 5065,979 v1(5041,955)
  Bottom Layer w8: v1(5041,955) J1.D23@5066,980
DIGITALPIXEL1_B: J1.D27 U1.124 | length 3775.3
  Top Layer w5: 1801.96,348 1823,326.96
  Top Layer w5.04: 1801.96,348 1801.96,410.96 1814,423 U1.124@1814,442
  Top Layer w6: 1823,326.96 2034.59,326.96 2066.63,359 2269,359 2345,435 v2(2395,435) ; v2(4540,535) 4575,535 4629.25,480.75 4904.25,480.75 4966,542.5 4966,716 5005,755 v1(5041,755)
  Signal 2 w6: v2(2395,435) 2415,435 2470,490 2470,520 2518,568 2528,568 3888,568 3938,518 4320.03,518 4332.56,505.47 4424.47,505.47 4454,535 v2(4540,535)
  Bottom Layer w8: v1(5041,755) J1.D27@5066,780
DIGITALPIXEL1_T: J1.D24 U1.271 | length 3992.5
  Top Layer w5: 1805.97,1789.67 1805.97,1789.13 1814,1781.1 1814,1775.13 ; 1805.97,1831.12 1805.97,1833.87 1843.21,1871.11 ; 1847.78,1875 1911.91,1875 1914.96,1878.05 2124.5,1878.05 2125,1877.55
  Top Layer w5.04: 1805.97,1789.67 1805.97,1831.12 ; U1.271@1814,1768 1814,1775.13 ; 1843.21,1871.11 1843.89,1871.11
  Top Layer w6: 1843.89,1871.11 1847.78,1875 ; 2125,1877.55 2222.55,1780 v2(2225,1780)
  Signal 2 w6: v2(2225,1780) 2325,1680 2350,1680 2500,1530 4265,1530 4380,1415 4763.5,1415 4771.5,1423 4907,1423 5015,1315 5015,931 v1(5041,905)
  Bottom Layer w8: v1(5041,905) J1.D24@5066,930
FMC_3P3V: J1.C39 J1.D36 J1.D38 J1.D40 JMP1.3 | length 141.4
  Bottom Layer w8: v1(5041,105) J1.D40@5066,130 ; v1(5041,205) J1.D38@5066,230 ; v1(5041,305) J1.D36@5066,330 ; v1(5091,155) J1.C39@5116,180
FMC_3P3Vaux: J1.D32 pad.64@5225,560 | length 242.1
  Top Layer w8: v1(5041,505) 5066,530 5180,530 5210,560 pad.64@5225,560
  Bottom Layer w8: v1(5041,505) J1.D32@5066,530